# Altium PCB Main.PcbDoc (part 1 of 2)
Units mm, origin at the board's own origin, x right, y up, seen from the top; angles counter-clockwise.
Board outline 40.1 x 80 mm, 2 copper layers (Top Layer, Bottom Layer), stack 1.569 mm thick; 84 components, 82 nets, 339 pads, 242 vias.
Unrouted connection lines stored in the file: 3.
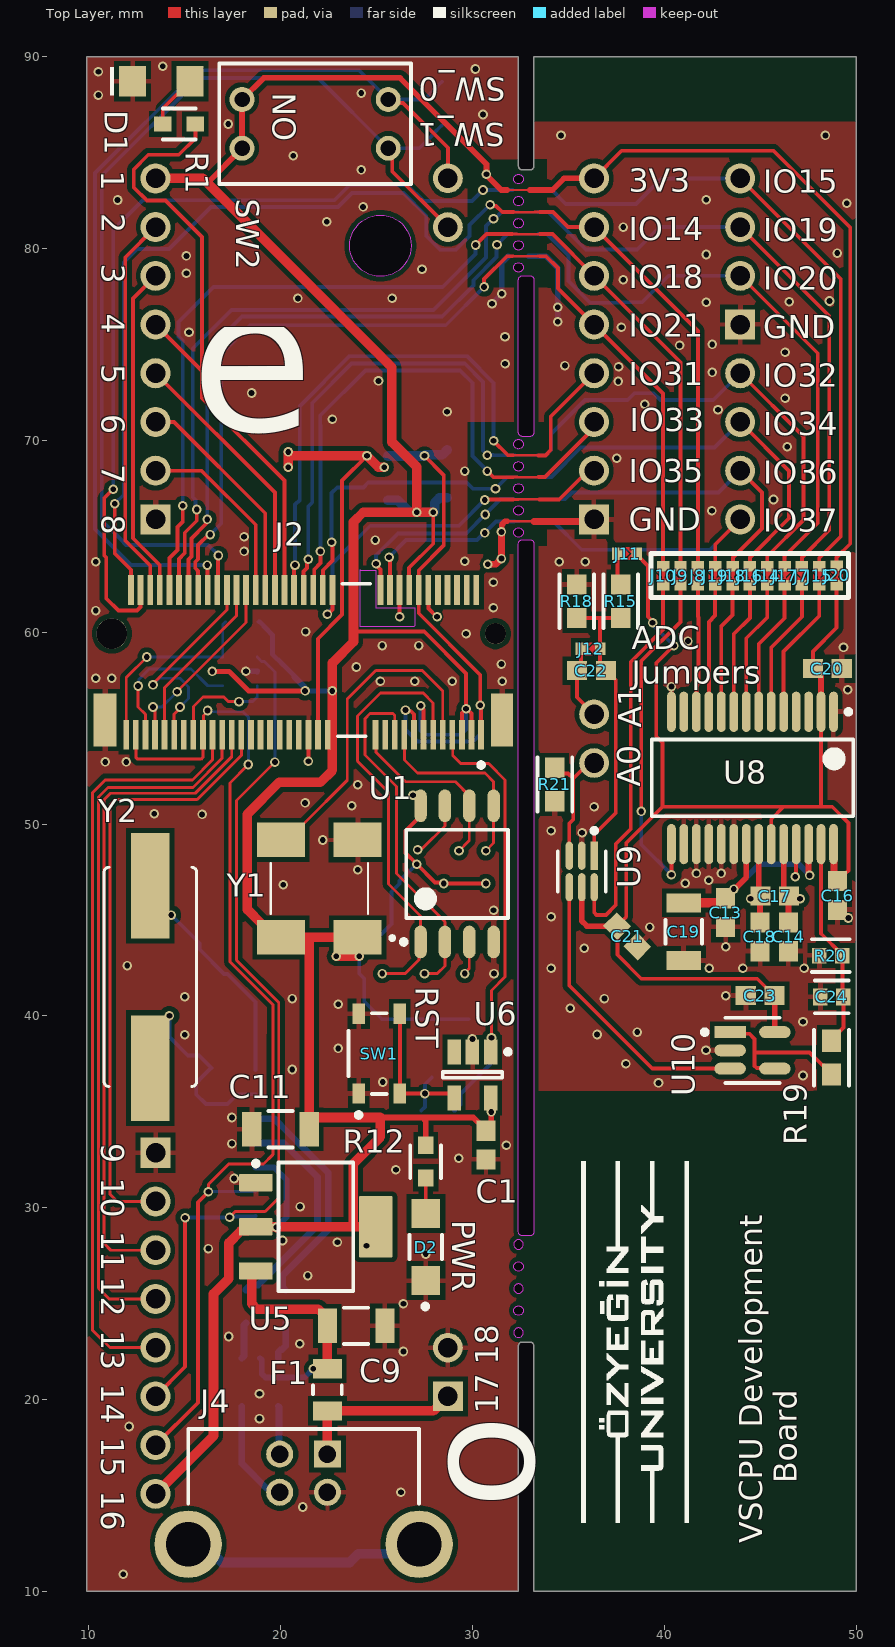
[diagram p0: Top Layer view]
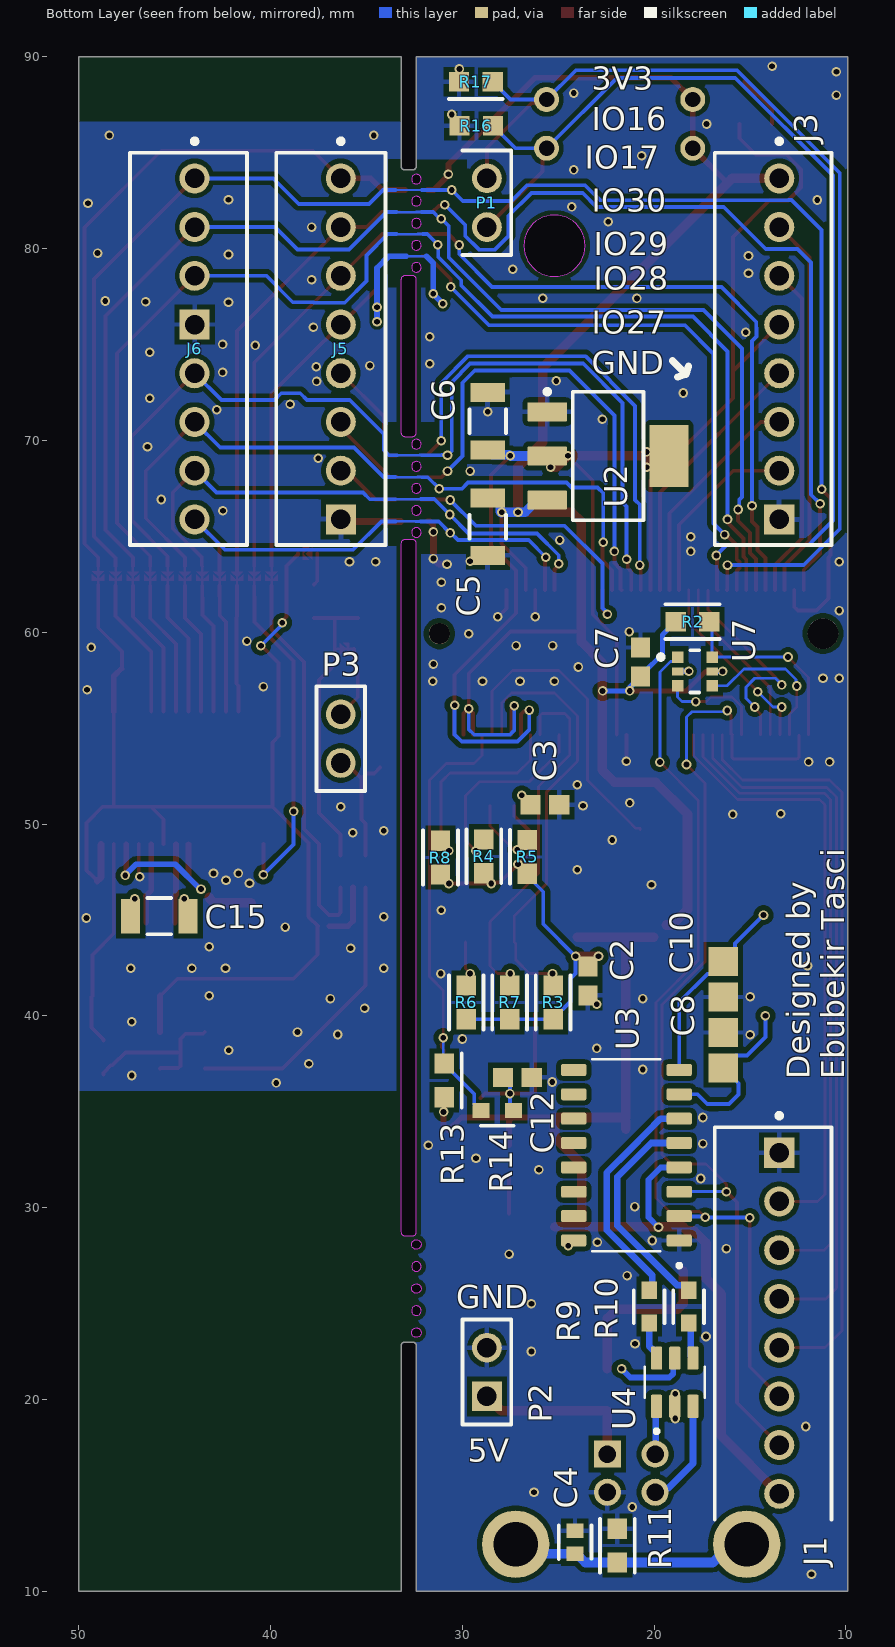
[diagram p1: Bottom Layer view, seen from below]
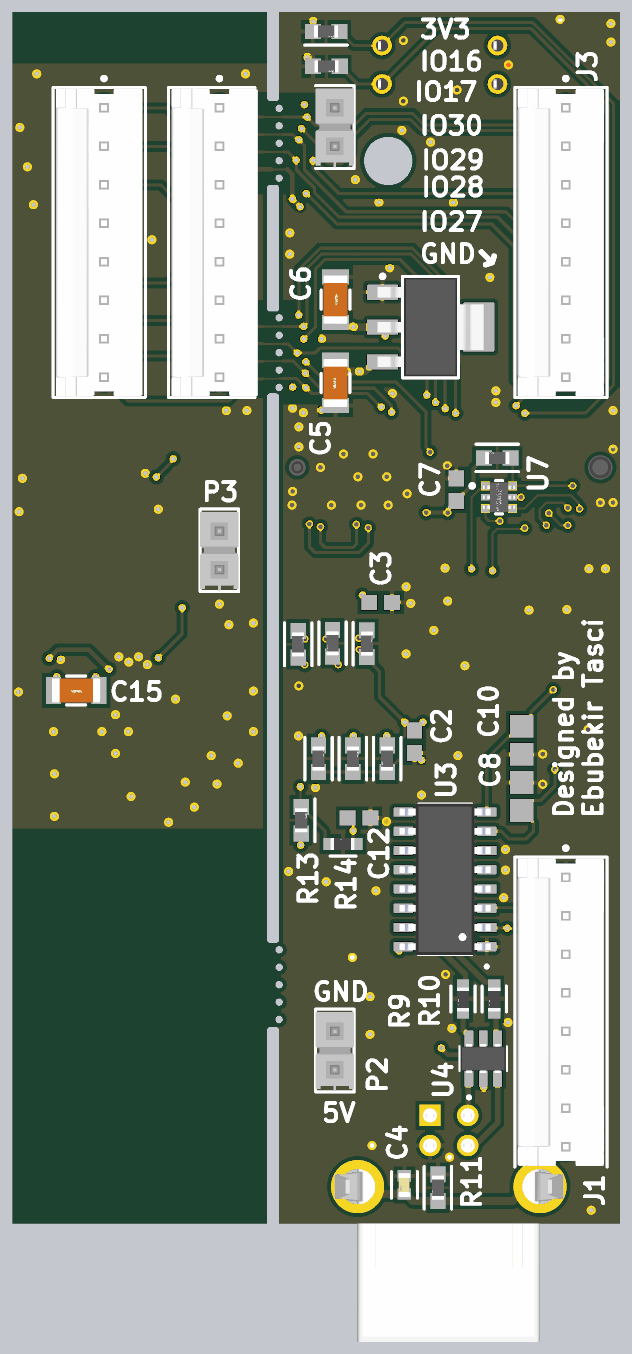
[diagram p3: 3D render of the assembled board from below, using the file's embedded part models]

## Layer stack, top to bottom
Top Solder: solder mask 0.0254, SM-001, Dk 4
Top Layer: signal copper 0.035
Dielectric 1: core 1.4986, Core-043, Dk 4.3
Bottom Layer: signal copper 0.035
Bottom Solder: solder mask 0.0254, SM-001, Dk 4

## Board outline
9.9,10 32.4,10 32.4,22.801 cw(c32.59,22.801) 32.592,22.991 32.804,22.989 32.988,22.991 cw(c32.991,22.781) 33.2,22.781 33.2,10 50,10 50,90 33.2,90 33.2,84.3 cw(c33,84.3) 33,84.1 32.6,84.1 cw(c32.6,84.3) 32.4,84.3 32.4,86 32.4,90 9.9,90
cut-out: 32.399,28.731 32.399,64.62 cw(c32.599,64.62) 32.599,64.82 33.002,64.82 cw(c33.002,64.62) 33.202,64.62 33.202,28.731 cw(c33.002,28.731) 33.002,28.531 32.599,28.531 cw(c32.599,28.731)
cut-out: 32.4,70.4 32.4,78.38 cw(c32.6,78.38) 32.6,78.58 33,78.58 cw(c33,78.38) 33.2,78.38 33.2,70.4 cw(c33,70.4) 33,70.2 32.6,70.2 cw(c32.6,70.4)
cut-out: 32.15,26.93 cw(c32.4,26.93) 32.4,27.18 cw(c32.4,26.93) 32.65,26.93 cw(c32.4,26.93) 32.4,26.68 cw(c32.4,26.93)
cut-out: 32.15,28.08 ccw(c32.4,28.08) 32.4,27.83 ccw(c32.4,28.08) 32.65,28.08 ccw(c32.4,28.08) 32.4,28.33 ccw(c32.4,28.08)
cut-out: 32.15,23.48 ccw(c32.4,23.48) 32.4,23.23 ccw(c32.4,23.48) 32.65,23.48 ccw(c32.4,23.48) 32.4,23.73 ccw(c32.4,23.48)
cut-out: 32.15,25.78 ccw(c32.4,25.78) 32.4,25.53 ccw(c32.4,25.78) 32.65,25.78 ccw(c32.4,25.78) 32.4,26.03 ccw(c32.4,25.78)
cut-out: 32.15,24.63 cw(c32.4,24.63) 32.4,24.88 cw(c32.4,24.63) 32.65,24.63 cw(c32.4,24.63) 32.4,24.38 cw(c32.4,24.63)
cut-out: 32.4,83.37 cw(c32.4,83.62) 32.15,83.62 cw(c32.4,83.62) 32.4,83.87 cw(c32.4,83.62) 32.65,83.62 cw(c32.4,83.62)
cut-out: 32.4,82.22 cw(c32.4,82.47) 32.15,82.47 cw(c32.4,82.47) 32.4,82.72 cw(c32.4,82.47) 32.65,82.47 cw(c32.4,82.47)
cut-out: 32.4,78.77 cw(c32.4,79.02) 32.15,79.02 cw(c32.4,79.02) 32.4,79.27 cw(c32.4,79.02) 32.65,79.02 cw(c32.4,79.02)
cut-out: 32.15,81.32 cw(c32.4,81.32) 32.4,81.57 cw(c32.4,81.32) 32.65,81.32 cw(c32.4,81.32) 32.4,81.07 cw(c32.4,81.32)
cut-out: 32.15,80.17 cw(c32.4,80.17) 32.4,80.42 cw(c32.4,80.17) 32.65,80.17 cw(c32.4,80.17) 32.4,79.92 cw(c32.4,80.17)
cut-out: 32.4,69.55 cw(c32.4,69.8) 32.15,69.8 cw(c32.4,69.8) 32.4,70.05 cw(c32.4,69.8) 32.65,69.8 cw(c32.4,69.8)
cut-out: 32.15,68.65 cw(c32.4,68.65) 32.4,68.9 cw(c32.4,68.65) 32.65,68.65 cw(c32.4,68.65) 32.4,68.4 cw(c32.4,68.65)
cut-out: 32.15,65.2 cw(c32.4,65.2) 32.4,65.45 cw(c32.4,65.2) 32.65,65.2 cw(c32.4,65.2) 32.4,64.95 cw(c32.4,65.2)
cut-out: 32.4,67.25 cw(c32.4,67.5) 32.15,67.5 cw(c32.4,67.5) 32.4,67.75 cw(c32.4,67.5) 32.65,67.5 cw(c32.4,67.5)
cut-out: 32.4,66.1 cw(c32.4,66.35) 32.15,66.35 cw(c32.4,66.35) 32.4,66.6 cw(c32.4,66.35) 32.65,66.35 cw(c32.4,66.35)
cut-out: 25.2,78.55 cw(c25.2,80.15) 23.6,80.15 cw(c25.2,80.15) 25.2,81.75 cw(c25.2,80.15) 26.8,80.15 cw(c25.2,80.15)

## Design rules (kind name [scope] priority, off if disabled: settings)
Clearance [All] p1: gap=0.254 ignorepadtopadclearanceinfootprint=TRUE except(0.15: Arc-Arc Arc-Track Track-Track; 0.2: Arc-SMDPad Arc-Via Arc-Hole Track-SMDPad Track-Via Track-Hole SMDPad-SMDPad)
DiffPairsRouting [All] p1: maxlimit=0.25 minlimit=0.2 mostfreqgap=0.2 toplayer_minwidth=0.25 toplayer_maxwidth=0.35 toplayer_prefwidth=0.25 bottomlayer_minwidth=0.25 bottomlayer_maxwidth=0.35 bottomlayer_prefwidth=0.25 maxuncoupledlength=5
MinimumSolderMaskSliver [All] p1: minsoldermaskwidth=0.1
NetAntennae [All] p1: netantennaetolerance=1.5
PlaneConnect [All] p1: pad.planeconnectstyle=Relief pad.reliefexpansion=0.508 pad.reliefentries=4 pad.reliefconductorwidth=0.254 pad.reliefairgap=0.254 via.planeconnectstyle=Direct via.reliefexpansion=0.508 via.reliefentries=4 via.reliefconductorwidth=0.254 via.reliefairgap=0.254
PolygonConnect [All] p1: thpad.connectstyle=Relief thpad.reliefconductorwidth=0.254 thpad.reliefentries=4 thpad.polygonreliefangle="90 Angle" thpad.airgapwidth=0.254 smdpad.connectstyle=Relief smdpad.reliefconductorwidth=0.254 smdpad.reliefentries=4 smdpad.polygonreliefangle="90 Angle" smdpad.airgapwidth=0.254 via.connectstyle=Direct via.reliefconductorwidth=0.254 via.reliefentries=4 via.polygonreliefangle="90 Angle" via.airgapwidth=0.254
RoutingVias [All] p1: holewidth=0.711 width=1.27 viastyle="Through Hole" minholewidth=0.711 minwidth=1.27 maxholewidth=0.711 maxwidth=1.27
SilkToSolderMaskClearance [IsPad] p1: minsilkscreentomaskgap=0.2 clearancetoexposedcopper=TRUE
SolderMaskExpansion [All] p1: expansion=0.05 istentingtop=FALSE
SupplyNets "Schematic Supply Nets_5" [InNet('+3.3V_ADC')] p1: voltage=0.000
SupplyNets "Schematic Supply Nets_4" [InNet('+5V')] p2: voltage=0.000
SupplyNets "Schematic Supply Nets_3" [InNet('+5V_USB')] p3: voltage=0.000
SupplyNets "Schematic Supply Nets_2" [InNet('GND')] p4: voltage=0.000
SupplyNets "Schematic Supply Nets_1" [InNet('+3.3V')] p5: voltage=0.000
SupplyNets "Schematic Supply Nets" [InNet('+1.8V')] p6: voltage=0.000
Width [All] p1: maxlimit=2 minlimit=0.127 preferedwidth=0.2 minimp=50.000000 maximp=50.000000 favimp=50.000000
25 further rules are at their usual default settings.

## Classes and differential pairs
differential pair USB_1: +USB_1_P -USB_1_N
differential pair USB_2: +USB_2_P -USB_2_N

## Components (designator, comment, footprint, x,y, rotation, side; value= is the part's Value field where it differs from the comment)
C1 "100nF 0603" CAPC1608X90X35NL15T15 30.706,33.261 r90 top
C2 "100nF 0603" CAPC1608X90X35NL15T15 23.458,41.817 r90 bottom
C3 "100nF 0603" CAPC1608X90X35NL15T15 25.7,51 r0 bottom
C4 "4.7nF 0603" FP-C0603C-CF-MFG 24.13,12.56 r90 bottom value="4,700 pF"
C5 "10uF 1206" FP-CC1206-FD-MFG 28.679,65.5 r90 bottom
C6 "10uF 1206" FP-CC1206-FD-MFG 28.679,71 r270 bottom
C7 "100nF 0603" CAPC1608X90X35NL15T15 20.712,58.449 r270 bottom
C8 "22pF 0805" CAPC2013X145X48ML20T23 16.4,38.204 r90 bottom
C9 "10uF 1206" FP-CC1206-FD-MFG 23.937,23.833 r180 top
C10 "22pF 0805" CAPC2013X145X48ML20T23 16.4,41.908 r270 bottom
C11 "10uF 1206" FP-CC1206-FD-MFG 19.989,34.089 r0 top
C12 "100nF 0603" CAPC1608X90X35NL15T15 27.13,36.79 r180 bottom
C13 "100nF 0603" CAPC1608X90X35NL15T15 43.2,45.377 r270 top
C14 "100nF 0603" CAPC1608X90X35NL15T15 46.478,44.113 r90 top
C15 "10uF 1206" FP-CC1206-FD-MFG 45.8,45.2 r0 bottom
C16 "100nF 0603" CAPC1608X90X35NL15T15 49.04,46.271 r90 top
C17 "100nF 0603" CAPC1608X90X35NL15T15 45.762,46.242 r0 top
C18 "100nF 0603" CAPC1608X90X35NL15T15 44.99,44.113 r90 top
C19 "10uF 1206" FP-CC1206-FD-MFG 41.021,44.387 r90 top
C20 "100nF 0603" CAPC1608X90X35NL15T15 48.5,58.1 r180 top
C21 "100nF 0603" CAPC1608X90X35NL15T15 38.066,44.145 r315 top
C22 "100nF 0603" CAPC1608X90X35NL15T15 36.204,58 r180 top
C23 "100nF 0603" CAPC1608X90X35NL15T15 45.002,41.054 r0 top
C24 "4.7nF 0603" FP-C0603C-CF-MFG 48.739,40.985 r180 top value="4,700 pF"
D1 "LED 1206 AMBER" WL-SMCW_1206_150120xx75000 13.783,88.725 r0 top
D2 "LED 1206 RED" FP-LTST-C150KRKT-MFG 27.566,27.945 r90 top
F1 "FSMD020-0805-R" FP-0805L-MFG 22.437,20.504 r90 top value=0.15-0.85Ω
J1 "640456-8" FP-640456-8-MFG#1 13.797,23.97 r90 bottom
J2 "2199230-4" FP-2199230-4-MFG 21.2,58.55 r180 top
J3 "640456-8" FP-640456-8-MFG#2 13.797,74.77 r90 bottom
J4 "897-43-004-90-000000" FP-897-43-004-90-000000-MFG 21.2,10.3 r0 top
J5 "640456-8" FP-640456-8-MFG#2 36.657,74.77 r90 bottom
J6 "640456-8" FP-640456-8-MFG#3 44.277,74.77 r90 bottom
J7 "JUMPER" JUMPER 47.177,62.989 r180 top net-tie
J8 "JUMPER" JUMPER 41.751,62.989 r180 top net-tie
J9 "JUMPER" JUMPER 40.847,62.989 r180 top net-tie
J10 "JUMPER" JUMPER 39.943,62.989 r180 top net-tie
J11 "JUMPER" "Copy of JUMPER" 38.013,64.099 r270 top net-tie
J12 "JUMPER" JUMPER 36.207,59.129 r90 top net-tie
J14 "JUMPER" JUMPER 45.368,62.989 r180 top net-tie
J15 "JUMPER" JUMPER 48.081,62.989 r180 top net-tie
J16 "JUMPER" JUMPER 44.464,62.989 r180 top net-tie
J17 "JUMPER" JUMPER 46.273,62.989 r180 top net-tie
J18 "JUMPER" JUMPER 43.56,62.989 r180 top net-tie
J19 "JUMPER" JUMPER 42.656,62.989 r180 top net-tie
J20 "JUMPER" JUMPER 48.985,63.008 r180 top net-tie
P1 "TSW-102-26-L-S" SMTC-TSW-102-26-XX-S#1 28.72,81.12 r90 bottom
P2 "TSW-102-26-L-S" SMTC-TSW-102-26-XX-S#2 28.72,20.16 r90 bottom
P3 "TSW-102-26-L-S" SMTC-TSW-102-26-XX-S#1 36.339,53.18 r90 bottom
R1 "100R 0603" FP-RT0603-MFG 14.703,86.496 r0 top value=100Ω
R2 "10k 0603" FP-AC0603-IPC_A 18.002,60.547 r0 bottom
R3 "10k 0603" FP-AC0603-IPC_A 25.268,40.7 r270 bottom
R4 "10k 0603" FP-AC0603-IPC_A 28.877,48.316 r270 bottom
R5 "10k 0603" FP-AC0603-IPC_A 26.61,48.29 r90 bottom
R6 "10k 0603" FP-AC0603-IPC_A 29.8,40.7 r90 bottom
R7 "10k 0603" FP-AC0603-IPC_A 27.534,40.7 r90 bottom
R8 "10k 0603" FP-AC0603-IPC_A 31.143,48.248 r90 bottom
R9 "100R 0603" FP-RT0603-MFG 20.261,24.837 r270 bottom value=100Ω
R10 "100R 0603" FP-RT0603-MFG 18.2,24.837 r270 bottom value=100Ω
R11 "1MR 0603" FP-AC0603-IPC_A 21.917,12.377 r270 bottom
R12 "100R 0603" FP-RT0603-MFG 27.566,32.399 r270 top value=100Ω
R13 "10k 0603" FP-AC0603-IPC_A 30.942,36.634 r90 bottom
R14 "100R 0603" FP-RT0603-MFG 28.182,35.065 r0 bottom value=100Ω
R15 "1MR 0603" FP-AC0603-IPC_A 37.731,61.614 r90 top
R16 "10k 0603" FP-AC0603-IPC_A 29.277,86.4 r180 bottom
R17 "10k 0603" FP-AC0603-IPC_A 29.3,88.7 r180 bottom
R18 "1MR 0603" FP-AC0603-IPC_A 35.439,61.614 r270 top
R19 "2.2k 0603" FP-RN73R1J-IPC_A 48.718,37.824 r90 top
R20 "3.3k 0603" FP-TFCR0603-IPC_C 48.686,43.142 r0 top
R21 "1MR 0603" FP-AC0603-IPC_A 34.295,52.062 r90 top
SW1 "PTS810 SJG 250 SMTR LFS" FP-PTS810_SJG_250_SMTR_LF-MFG 25.14,38.03 r90 top
SW2 "418117170902" 418117170902 21.8,86.5 r90 top
U1 "MX25L3233FM2I-08G" MXIC-SOP-8_N 29.2,47.4 r90 top
U2 "TLV1117LV18DCYR" DCY0004A_M 22.4,69.187 r180 bottom
U3 "CH340G" SOIC127P600X180-16N 21.446,32.732 r0 bottom
U4 "USBLC6-2SC6" SOT95P280X145-6N 18.928,20.898 r90 bottom
U5 "TLV1117LV33DCYR" DCY0004A_N 21.834,29 r0 top
U6 "MCP1319MT-33AE/OT" SOT-23-OT5_M 30,36.92 r270 top
U7 "74LVC1G157GW,125" FP-SOT363-MFG 17.883,57.955 r180 bottom
U8 "AD9280ARSZ" RS-28_N 44.6,52.4 r270 top
U9 "SN74LVC1G3157DCKR" FP-DCK0006A-IPC_B 35.7,47.525 r270 top
U10 "MCP6001T-I/OT" FP-C04-091-OT-IPC_A 44.6,38.2 r0 top
Y1 "ASV-10.000MHZ-E-T" XTAL_ASV-10.000MHZ-E-T 22.016,46.627 r180 top
Y2 "AS-12.000-20-SMD-TR" XTAL1170X500X450 13.207,42.029 r270 top

## Footprints (in the part's own frame and the unit in brackets; to place one, negate y for a bottom-side part, rotate by r counter-clockwise, add the part's x,y. Pads: shape width x height; smd on the part's side, far side on the other; paste and mask are expansions set on the pad)
418117170902 [mm] "2.54 mm compact THT with flat actuator, 2p"
  round 1.3 hole 0.8: 1(-1.27,-3.81) 2(1.27,-3.81) 3(1.27,3.81) 4(-1.27,3.81)
  silkscreen extent -3.14,-5 3.14,5, body extent -3.04,-4.95 3.04,4.95, height 5.75
CAPC1608X90X35NL15T15 [mm] "Chip Capacitor, 2-Leads, Body 1.60x0.81mm, IPC Medium Density"
  rect 1.05x1 smd: 1(-0.75,0) 2(0.75,0)
  body extent -0.88,-0.48 0.87,0.48, height 0.9
CAPC2013X145X48ML20T23 [mm] "Chip Capacitor, 2-Leads, Body 2.00x1.25mm, IPC Low Density"
  rect 1.5x1.55 smd: 1(-0.925,0) 2(0.925,0)
  body extent -1.1,-0.72 1.1,0.72, height 1.45
"Copy of JUMPER" [mm]
  rect 0.65x0.55 smd paste-2.54 mask-2.54: 1(0,-0.45) 2(0,0.55)
  Top Layer region: -0.325,-0.041 0,0.284 0.325,-0.041 0.325,0.318 -0.325,0.317
  Top Layer region: -0.325,-0.175 0.003,0.152 0.325,-0.175
DCY0004A_M [mm] "SOT223, 4-Leads, Body 6.7x3.7mm, Pitch 2.3mm, IPC Low Density"
  rrect10% 2.05x1 smd: 1(-3.175,2.3) 2(-3.175,0) 3(-3.175,-2.3)
  rrect5% 2.05x3.25 smd: 4(3.175,0)
  silkscreen extent -3.3,-3.35 1.85,3.47, body extent -3.5,-3.25 3.5,3.25, height 1.62
DCY0004A_N [mm] "SOT223, 4-Leads, Body 6.7x3.7mm, Pitch 2.3mm, IPC Medium Density"
  rrect11% 1.75x0.9 smd: 1(-3.125,2.3) 2(-3.125,0) 3(-3.125,-2.3)
  rrect6% 1.75x3.2 smd: 4(3.125,0)
  silkscreen extent -3.25,-3.35 1.95,3.42, body extent -3.5,-3.25 3.5,3.25, height 1.62
FP-0805L-MFG [mm]
  rect 1x1.5 smd paste+0 mask+0: 1(-1.1,0) 2(1.1,0)
  silkscreen extent -0.23,-0.75 0.23,0.75, body extent -1.05,-0.67 1.05,0.67, height 1.25
FP-897-43-004-90-000000-MFG [mm]
  rect 1.41x1.41 hole 0.91 paste-2539.97 mask+0: 1(1.24,6.85)
  round 1.41 hole 0.91 paste-2539.97 mask+0: 2(-1.25,6.85) 3(-1.25,4.86) 4(1.24,4.86)
  round 3.51 hole 2.31 paste-2539.97 mask+0: 5(-6.02,2.15) 6(6.02,2.15)
  silkscreen extent -6.02,4.28 6.02,8.15, body extent -7.88,-8.25 7.88,8.25, height 0.25
FP-640456-8-MFG#1 [mil]
  rect 61.65x61.65 hole 40 paste-99999 mask+0: 1(350,-12.5)
  round 61.65 hole 40 paste-99999 mask+0: 2(250,-12.5) 3(150,-12.5) 4(50,-12.5) 5(-50,-12.5) 6(-150,-12.5) 7(-250,-12.5) 8(-350,-12.5)
  silkscreen extent -403,-120 431,120, body extent -400,-113 400,113, height 415
FP-640456-8-MFG#2 [mil]
  round 61.65 hole 40 paste-99999 mask+0: 1(350,-12.5) 2(250,-12.5) 3(150,-12.5) 4(50,-12.5) 5(-50,-12.5) 6(-150,-12.5) 7(-250,-12.5)
  rect 61.65x61.65 hole 40 paste-99999 mask+0: 8(-350,-12.5)
  silkscreen extent -402,-120 431,120, body extent -400,-113 400,113, height 415
FP-640456-8-MFG#3 [mil]
  round 61.65 hole 40 paste-99999 mask+0: 1(350,-12.5) 2(250,-12.5) 3(150,-12.5) 5(-50,-12.5) 6(-150,-12.5) 7(-250,-12.5) 8(-350,-12.5)
  rect 61.65x61.65 hole 40 paste-99999 mask+0: 4(50,-12.5)
  silkscreen extent -402,-120 431,120, body extent -400,-113 400,113, height 415
FP-2199230-4-MFG [mm]
  rect 0.3x1.55 smd paste+0 mask+0: 1(-9.25,3.9) 2(-9,-3.65) 3(-8.75,3.9) 4(-8.5,-3.65) 5(-8.25,3.9) 6(-8,-3.65) 7(-7.75,3.9) 8(-7.5,-3.65) 9(-7.25,3.9) 10(-7,-3.65) 11(-6.75,3.9) 12(-6.5,-3.65) 13(-6.25,3.9) 14(-6,-3.65) 15(-5.75,3.9) 16(-5.5,-3.65) 17(-5.25,3.9) 18(-5,-3.65) 19(-4.75,3.9) 20(-4.5,-3.65) 21(-4.25,3.9) 22(-4,-3.65) 23(-3.75,3.9) 32(-1.5,-3.65) 33(-1.25,3.9) 34(-1,-3.65) 35(-0.75,3.9) 36(-0.5,-3.65) 37(-0.25,3.9) 38(0,-3.65) 39(0.25,3.9) 40(0.5,-3.65) 41(0.75,3.9) 42(1,-3.65) 43(1.25,3.9) 44(1.5,-3.65) 45(1.75,3.9) 46(2,-3.65) 47(2.25,3.9) 48(2.5,-3.65) 49(2.75,3.9) 50(3,-3.65) 51(3.25,3.9) 52(3.5,-3.65) 53(3.75,3.9) 54(4,-3.65) 55(4.25,3.9) 56(4.5,-3.65) 57(4.75,3.9) 58(5,-3.65) 59(5.25,3.9) 60(5.5,-3.65) 61(5.75,3.9) 62(6,-3.65) 63(6.25,3.9) 64(6.5,-3.65) 65(6.75,3.9) 66(7,-3.65) 67(7.25,3.9) 68(7.5,-3.65) 69(7.75,3.9) 70(8,-3.65) 71(8.25,3.9) 72(8.5,-3.65) 73(8.75,3.9) 74(9,-3.65) 75(9.25,3.9)
  rect 1.15x2.75 smd paste+0 mask+0: 76(-10.35,3.125)
  rect 1.2x2.75 smd paste+0 mask+0: 77(10.35,3.125)
  round 1.1 hole 1.1 unplated paste-2539.97 mask+0: ""(-10,-1.375)
  round 1.6 hole 1.6 unplated paste-2539.97 mask+0: ""(10,-1.375)
  silkscreen extent -9.38,-3.98 -1.78,5.6, body extent -11.1,-4.52 11.1,4.77, height 0.25
FP-AC0603-IPC_A [mm]
  rect 1.059x1.012 smd paste+0 mask+0: 1(-0.877,0) 2(0.877,0)
  silkscreen extent -1.41,-0.91 1.41,0.91, body extent -0.8,-0.4 0.8,0.4, height 0.55
FP-C04-091-OT-IPC_A [mil]
  rect 64.5x24.33 smd paste+0 mask+0: 1(-45.91,37.4)
  rrect100% 64.5x24.33 smd paste+0 mask+0: 2(-45.91,0) 3(-45.91,-37.4) 4(45.91,-37.4) 5(45.91,37.4)
  silkscreen extent -103,-67 55,67
FP-C0603C-CF-MFG [mm]
  rect 0.75x0.9 smd paste+0 mask+0: 1(-0.6,0) 2(0.6,0)
  silkscreen extent -0.87,-0.85 0.88,0.85, body extent -0.8,-0.4 0.8,0.4, height 0.87
FP-CC1206-FD-MFG [mm]
  rect 1x1.8 smd paste+0 mask+0: 1(-1.5,0) 2(1.5,0)
  silkscreen extent -0.63,-0.95 0.63,0.95, body extent -1.6,-0.8 1.6,0.8, height 1.9
FP-DCK0006A-IPC_B [mm]
  rect 1.464x0.376 smd paste+0 mask+0: 1(-0.82,0.65)
  rrect100% 1.464x0.376 smd paste+0 mask+0: 2(-0.82,0) 3(-0.82,-0.65) 4(0.82,-0.65) 5(0.82,0) 6(0.82,0.65)
  silkscreen extent -2.25,-1.25 1.05,1.25
FP-LTST-C150KRKT-MFG [mm]
  rect 1.5x1.5 smd paste+0 mask+0: 1(-1.75,0) 2(1.75,0)
  silkscreen extent -3.22,-0.85 0.63,0.85, body extent -2.6,-0.95 2.6,0.95, height 0.25
FP-PTS810_SJG_250_SMTR_LF-MFG [mm]
  rect 1.05x0.65 smd paste+0 mask+0: 1(-2.075,1.075) 2(2.075,1.075) 3(-2.075,-1.075) 4(2.075,-1.075)
  silkscreen extent -3.32,-0.38 2.1,1.6, body extent -2.7,-1.7 2.7,1.7, height 0.25
FP-RN73R1J-IPC_A [mm]
  rect 1.156x1.012 smd paste+0 mask+0: 1(-0.875,0) 2(0.875,0)
  silkscreen extent -1.45,-0.91 1.45,0.91, body extent -1.95,-1.01 1.95,1.01, height 0.25
FP-RT0603-MFG [mm]
  rect 0.9x0.8 smd paste+0 mask+0: 1(-0.85,0) 2(0.85,0)
  silkscreen extent -0.85,-0.81 0.86,0.8, body extent -1.4,-0.55 1.4,0.55, height 0.25
FP-SOT363-MFG [mm]
  rect 0.6x0.6 smd paste-1000 mask+0: 1(-0.9,0.75) 3(-0.9,-0.75) 4(0.9,-0.75) 6(0.9,0.75)
  rect 0.6x0.4 smd paste+0 mask+0: 2(-0.9,0) 5(0.9,0)
  silkscreen extent -1.9,-1.1 0.23,1.1, body extent -1.05,-1 1.05,1, height 1.1
FP-TFCR0603-IPC_C [mm]
  rect 0.758x0.812 smd paste+0 mask+0: 1(-0.602,0) 2(0.602,0)
  silkscreen extent -0.98,-0.85 0.98,0.85, body extent -1.08,-0.55 1.08,0.55, height 0.25
JUMPER [mm]
  rect 0.65x0.55 smd paste-2.54 mask-2.54: 1(0,-0.45) 2(0,0.55)
  Top Layer region: -0.325,-0.175 0.003,0.152 0.325,-0.175
  Top Layer region: -0.325,-0.041 0,0.284 0.325,-0.041 0.325,0.318 -0.325,0.317
  Top Layer lines w0.127: 0,0.55 0,-0.45
MXIC-SOP-8_N [mm] "SOP, 8-Leads, Body 5.4x5.3mm, Pitch 1.27mm, IPC Medium Density"
  oval 1.7x0.65 smd: 1(-3.55,1.905) 2(-3.55,0.635) 3(-3.55,-0.635) 4(-3.55,-1.905) 5(3.55,-1.905) 6(3.55,-0.635) 7(3.55,0.635) 8(3.55,1.905)
  silkscreen extent -3.67,-2.65 2.3,2.9, body extent -3.95,-2.65 3.95,2.65, height 2.16
RS-28_N [mm] "SOP, 28-Leads, Body 10.2x5.3mm, Pitch 0.65mm, IPC Medium Density"
  oval 2.1x0.45 smd: 1(-3.45,4.225) 2(-3.45,3.575) 3(-3.45,2.925) 4(-3.45,2.275) 5(-3.45,1.625) 6(-3.45,0.975) 7(-3.45,0.325) 8(-3.45,-0.325) 9(-3.45,-0.975) 10(-3.45,-1.625) 11(-3.45,-2.275) 12(-3.45,-2.925) 13(-3.45,-3.575) 14(-3.45,-4.225) 15(3.45,-4.225) 16(3.45,-3.575) 17(3.45,-2.925) 18(3.45,-2.275) 19(3.45,-1.625) 20(3.45,-0.975) 21(3.45,-0.325) 22(3.45,0.325) 23(3.45,0.975) 24(3.45,1.625) 25(3.45,2.275) 26(3.45,2.925) 27(3.45,3.575) 28(3.45,4.225)
  silkscreen extent -3.57,-5.25 2,5.25, body extent -2.8,-5.25 2.8,5.25, height 2
SMTC-TSW-102-26-XX-S#1 [mm] ".025 SQ Post Terminal Strip Assembly, 1x2 Pins, Vertical, 2.54mm Pitch, Male"
  round 1.55 hole 1.02: 1(0,0) 2(2.54,0)
  silkscreen extent -1.46,-1.27 4,1.27, body extent -1.4,-1.27 3.81,1.27, height 8.38
SMTC-TSW-102-26-XX-S#2 [mm] ".025 SQ Post Terminal Strip Assembly, 1x2 Pins, Vertical, 2.54mm Pitch, Male"
  rect 1.55x1.55 hole 1.02: 1(0,0)
  round 1.55 hole 1.02: 2(2.54,0)
  silkscreen extent -1.46,-1.27 4,1.27, body extent -1.4,-1.27 3.81,1.27, height 8.38
SOIC127P600X180-16N [mm]
  rrect25% 1.31x0.62 smd: 1(-2.75,4.445) 2(-2.75,3.175) 3(-2.75,1.905) 4(-2.75,0.635) 5(-2.75,-0.635) 6(-2.75,-1.905) 7(-2.75,-3.175) 8(-2.75,-4.445) 9(2.75,-4.445) 10(2.75,-3.175) 11(2.75,-1.905) 12(2.75,-0.635) 13(2.75,0.635) 14(2.75,1.905) 15(2.75,3.175) 16(2.75,4.445)
  silkscreen extent -2.85,-5 1.78,5.85, body extent -3,-5 3,5, height 1.8
SOT95P280X145-6N [mm]
  rrect25% 1.21x0.59 smd: 1(-1.255,0.95) 2(-1.255,0) 3(-1.255,-0.95) 4(1.255,-0.95) 5(1.255,0) 6(1.255,0.95)
  silkscreen extent -2.65,-1.57 0.81,1.57, body extent -1.4,-1.46 1.4,1.46, height 0.4
SOT-23-OT5_M [mm] "SOT23, 5-Leads, Body 2.9x1.7mm, Pitch 0.95mm, Lead Span 2.8mm, IPC Low Density"
  rect 1.3x0.7 smd: 1(-1.2,0.95) 2(-1.2,0) 3(-1.2,-0.95) 4(1.2,-0.95) 5(1.2,0.95)
  silkscreen extent -1.32,-1.55 0.15,1.98, body extent -0.9,-1.55 0.9,1.55, height 1.45
WL-SMCW_1206_150120xx75000 [mm] "SMD Mono-color Chip LED, body 3.2x1.6mm"
  rect 1.4x1.6 smd: 1(-1.5,0) 2(1.5,0)
  silkscreen extent -2.68,-0.75 -2.48,0.75, body extent -1.6,-0.8 1.6,0.8, height 0.68
XTAL1170X500X450 [mm]
  rect 5.5x2 smd: 1(-4.75,0) 2(4.75,0)
  silkscreen extent -5.72,-2.41 5.72,2.41, body extent -6.75,-2.5 6.75,2.5, height 4.5
XTAL_ASV-10.000MHZ-E-T [mm]
  rect 2.5x1.8 smd: 1(-2,2.54) 2(-2,-2.54) 3(2,-2.54) 4(2,2.54)
  silkscreen extent -3.89,-1.32 2.54,2.67

## Part data
C1 C2 C3 C7 C12 C13 C14 C16 C17 C18 C20 C21 C22 C23: library part CMP-2006-02299-1, Manufacturer=Kemet, Part Number=C0603C104K4RAC7013
C4 C24: library part CMP-03020-030904-1, "C0603 4,700 pF X7R 30ppm/°C 20.00% 50 V", Capacitance="4,700 pF", Manufacturer=KEMET, Manufacturer Part Number=C0603C472M5RACAUTO, Package=C0603C-CF, Temperature="-55°C to +125°C", Temperature Characteristic=X7R, Temperature Coefficient=30ppm/°C, Temperature Range High=+125°C, Temperature Range Low=-55°C, Tolerance=0.2, Voltage Rating="50 V", Automotive=Yes, Automotive Grade="Grade 1", Category=Cap, ComponentLink2Description=Datasheet, ComponentLink2URL=https://api.kemet.com/component-edge/download/datasheet/C0603C100J5GACAUTO.pdf, Device Class L1="Passive Components", Device Class L2=Capacitors, Device Class L3="Ceramic Capacitors", Height=0.87mm, Lead Free=Yes, Material=Ceramic, Octopart=https://octopart.com/c0603c472m5racauto-kemet-21768561, RoHS=TRUE
C5 C6 C9 C11 C15 C19: library part CMP-03422-001420-1, "CAP CER 10UF 50V X5R 1206 / CC1206KKX5R9BB106", Capacitance=10uF, Case/Package=1206, Dielectric=X5R, Max Operating Temperature=85°C, Min Operating Temperature=-55°C, Tolerance=10%, Voltage Rating=50V, Halogen Free="Halogen Free", Lead Free="Lead Free", Length=0.126inch, Mount="Surface Mount", Packaging="Tape and Reel", RoHS Compliant=Yes, Thickness=0.075inch, Voltage Rating (DC)=50V, Width=0.063inch
C8 C10: library part CMP-2007-01710-1, Manufacturer=Vitramon, Part Number=VJ0805A220KXAMC
D1: library part CMP-1426-00018-5, "Led, 1206, Amber, 140Mcd, 605Nm;", Case Code (Imperial)=1206, Case Code (Metric)=3216, Color=Orange, Forward Current=100mA, Forward Voltage=2V, Manufacturer Lifecycle Status=ACTIVE, Max Operating Temperature=85°C, Max Reverse Voltage (DC)=5V, Min Operating Temperature=-40°C, Test Current=20mA, Case/Package=1206, Dominant Wavelength=605nm, Height=680µm, Length=3.2mm, Lens Style="Clear, Rectangular", Lifecycle Status=Production, Luminous Intensity=140mcd, Mount="Surface Mount", Packaging="Tape and Reel", Peak Wavelength=610nm, REACH SVHC=Unknown, RoHS=Compliant, Viewing Angle=140°, Wavelength=605nm, Width=1.6mm, YEOL="1 = Estimated lifetime > 10 years"
D2: library part CMP-2000-06617-2, "LED RED CLEAR 1206 SMD / LTST-C150KRKT", Case Code (Imperial)=1206, Case Code (Metric)=3216, Color=Red, Forward Current=30mA, Forward Voltage=2V, Lens Color=Colorless, Max Operating Temperature=85°C, Min Operating Temperature=-30°C, Package Quantity=1, Power Dissipation=62.5mW, Power Rating=75mW, Reverse Voltage=5V, Test Current=20mA, Case/Package=1206, Depth=1.6mm, Dominant Wavelength=631nm, Height=1.1mm, Illumination Color=Red, Lead Free="Lead Free", Length=3.2mm, Lens Style=Diffused, Lens Transparency=Clear, Luminous Intensity=54mcd, Mount="Surface Mount", Number of Elements=1, Number of LEDs=1, Number of Pins=2, Packaging="Tape and Reel", Radiation Hardening=No, Viewing Angle=130°, Wavelength=639nm, Width=1.6mm
F1: library part CMP-08606-000023-1, "PTC RESET FUSE 9V 200MA 0805", Ambient Temperature Range High=+85°C, Ambient Temperature Range Low=-40°C, Hold Current=0.2A, Manufacturer="Littelfuse Inc.", Manufacturer Part Number=0805L050WR, Package=0805L, Resistance=0.15-0.85Ω, Temperature="-40°C to +85°C", Trip Current=1A, Voltage Rating=6V, Automotive=No, Category=Fuse, Device Class L1="Circuit Protection", Device Class L2="PTC Resettable Fuses", Device Class L3=unset, Digikey Description="PTC RESET FUSE 6V 500MA 0805", Height=1.25mm, Lead Free=Yes, Octopart=https://octopart.com/0805l050wr-littelfuse-673858, RoHS=TRUE, Temperature Range High=+85°C, Temperature Range Low=-40°C, Trip Time=0.1s
J1 J3 J5 J6: library part CMP-03369-000098-1, "CONN HEADER VERT 8POS 2.54MM", RoHS Compliant=Yes
J2: library part CMP-03365-000002-1, "CONN FEMALE 67POS 0.020 GOLD", Current Rating=0.5A, Manufacturer="TE Connectivity", Package=0, Temperature="-40°C to +80°C", Temperature Range High=+80°C, Temperature Range Low=-40°C, Voltage Rating=50V, Automotive=No, Category=Conn, ComponentLink2Description=Datasheet, ComponentLink2URL=https://www.te.com/commerce/DocumentDelivery/DDEController?Action=showdoc&DocId=Customer+Drawing%7F2199230%7FB3%7Fpdf%7FEnglish%7FENG_CD_2199230_B3.pdf%7F2199230-4, Conn Gender=Female, Conn Orientation="Right Angle", Contact Material=Gold,Nickel, Device Class L1=Connectors, Device Class L2="Card Edge Connectors", Device Class L3=unset, Digikey Description="CONN FEMALE 67POS 0.020 GOLD", Height=4.2mm, Is Female=yes, Lead Free=Yes, Manufacturer Part Number=2199230-4, Mouser Description="PCI Express / PCI Connectors .5PITCH 4.2H KEY E EMBOSS NGFF MINICARD", Number Of Contacts=67, Number of Rows=2, Octopart=https://octopart.com/2199230-4-te+connectivity-46436156, Pitch=0.5mm, RoHS=TRUE
J4: library part CMP-07782-000001-1, "CONN RCPT USB2.0 TYPEB 4POS R/A", Flammability Rating="UL94 V-0", Insulation Resistance=1GR, Max Current Rating=1A, Max Voltage Rating (AC)=30V, Package Quantity=150, Connector Type=USB, Contact Material="Copper Alloy", Contact Plating=Gold, Depth=16mm, Gender=Receptacle, Housing Material=Thermoplastic, Lead Free="Lead Free", Length=12.03mm, Mount="Through Hole", Number Of Contacts=4, Number of Ports=1, Number of Positions=4, Number of Terminals=4, Orientation="Right Angle", Packaging=Tray, REACH SVHC="No SVHC", Termination="Through Hole", USB Standard="USB 2.0"
J7 J8 J9 J10 J12 J14 J15 J16 J17 J18 J19 J20: library part CMP-009-00061-3, Pins=2
J11: library part CMP-009-00061-5, Pins=2
P1 P2 P3: library part CMP-1024-00330-1, "0.025\" SQ Post Header, Through-hole, Vertical, -55 to 125 degC, 2.54 mm Pitch, 2-Pin, Male, RoHS", Manufacturer=Samtec, Temperature Range="-55 to 125 degC", ComponentLink1Description="Manufacturer URL", ComponentLink1URL=http://www.samtec.com, ComponentLink2Description=Datasheet, ComponentLink2URL=http://www.samtec.com/documents/webfiles/pdf/TSW_TH.PDF, ComponentLink3Description="Package Specification", ComponentLink3URL=http://www.samtec.com/documents/webfiles/cpdf/TSW-XXX-XX-XXX-X-XX-XXX-MKT.pdf, DatasheetVersion=F-214, Mounting Technology=Through-hole, Orientation=Vertical, PackageDescription=".025[0.64] SQ. Post Terminal Strip Assembly", PackageReference=TSW-102-26-XX-S, PackageVersion="DM, 8/1988", PartNumber=TSW-102-26-L-S, Pitch="2.54 mm", RoHS=True
R1 R9 R10 R12 R14: library part CMP-03412-003691-1, "Res Thin Film 0603 100 Ohm 0.1% 1/10W ±10ppm/°C Molded SMD Paper T/R", Manufacturer=Yageo, Manufacturer Part Number=RT0603BRB07100RL, Package=RT0603, Power Rating=0.1W, Resistance=100Ω, Temperature="-55°C to +155°C", Temperature Coefficient="10 ppm/°C", Temperature Range High=+155°C, Temperature Range Low=-55°C, Tolerance=0.001, Voltage Rating=75V, Automotive=No, Category=Res, ComponentLink2Description=Datasheet, ComponentLink2URL=http://www.yageo.com/documents/recent/PYu-RT_1-to-0.01_RoHS_L_9.pdf, Composition="Thin Film", Device Class L1="Passive Components", Device Class L2=Resistors, Device Class L3="Chip SMD Resistors", Digikey Description="Res Thin Film 0603 100 Ohm 0.1% 1/10W ±10ppm/°C Molded SMD Paper T/R", Footprint Url=http://www.yageo.com/exep/pages/download/literatures/PYu-R_Mount_10.pdf, Height=0.55mm, Ipc Land Pattern Name=RESC16080X45, Lead Free=Yes, Mouser Description="Thin Film Resistors 1/10W 100 ohm .1% 10ppm", Octopart=https://octopart.com/rt0603brb07100rl-yageo-30314052, RoHS=TRUE, Series=RT
R2 R3 R4 R5 R6 R7 R8 R13 R16 R17: library part CMP-03412-040683-1, "RES 10kΩ 5.00% 0.2W 0603"
R11 R15 R18 R21: library part CMP-03412-042588-1, "RES 1MΩ 1.00% 0.1W 0603", Case/Package=0603, Resistance=1MR, Tolerance=1%, RoHS Compliant=Yes
R19: library part CMP-04015-005569-1, "2.2kΩ ±0.1% 0.1W, 1/10W Chip Resistor 0603 (1608 Metric) Moisture Resistant Thin Film"
R20: library part CMP-250906-234254-1, "RES Thin Film,  3.3kΩ, 0.1%, 0.1W, 100ppm/°C, 0603"
SW1: library part CMP-10040-000011-1, "SWITCH TACTILE SPST-NO 0.05A 16V", Contact Resistance=500mΩ, Current Rating=50mA, Manufacturer="C&K Components", Operating Force=400gf, Temperature="-40°C to +85°C", Temperature Range High=+85°C, Temperature Range Low=-40°C, Voltage Rating Dc=16V, Automotive=No, Category=Switch, ComponentLink2Description=Datasheet, ComponentLink2URL=https://www.ckswitches.com/media/1476/pts810.pdf, Device Class L1=Electromechanical, Device Class L2=Switches, Device Class L3="Tactile Switches", Digikey Description="SWITCH TACTILE SPST-NO 0.05A 16V", Electromechanical Life=100000Cycles, Height=2.7mm, Lead Free=Yes, Manufacturer Part Number="PTS810 SJG 250 SMTR LFS", Mouser Description="Switch Tactile N.O. SPST Button J-Bend 0.05A 16VDC 100000Cycles 3.92N SMD T/R", Octopart=https://octopart.com/pts810sjg250smtrlfs-c%26k+components-29380277, Package="PTS810 SJG 250 SMTR LFS", RoHS=TRUE, Throw Configuration=SPST-NO
SW2: library part CMP-1434-00002-4, "Dip Switch, 0.025A, 24Vdc, 2 Pos, Tht Rohs Compliant: Yes", Current Rating=25mA, Insulation Resistance=100MΩ, Manufacturer Lifecycle Status=ACTIVE, Max Operating Temperature=85°C, Min Operating Temperature=-40°C, Voltage Rating=24V, Body Material="PBT, Polybutylene", Contact Plating=Gold, Electrical Life=2kcycles, Length=6.08mm, Lifecycle Status=Production, Mechanical Life=2kcycles, Number of Positions=2, Pitch=2.54mm, RoHS=Compliant, Termination="PC Pin", Throw Configuration=SPST, Voltage Rating (DC)=24V, Washable=No, YEOL="1 = Estimated lifetime > 10 years"
U1: library part CMP-2000-05278-1, "CMOS MXSMIO(R) (Serial Multi I/O) Flash Memory, 32 Mbits (x1/x2/x4), 3 V, -40 to 85 degC, 8-Pin SOP", Manufacturer=Macronix, Package Description="8-Pin Small Outline Package, Body 5.23 x 5.28 mm, Pitch 1.27 mm", Package Reference=SOP-8, Datasheet URL=http://datasheet.octopart.com/MX25L3233FM2I-08G-Macronix-datasheet-38883555.pdf, Datasheet Version="Rev. 1.1, 01/2015", Manufacturer URL=http://www.macronix.com
U2: library part CMP-0395-00524-2, "Single Output LDO, 1 A, Fixed 1.8 V Output, 2 to 5.5 V Input, 4-pin SOT-223 (DCY), -40 to 125 degC, Green (RoHS & no Sb/Br)", Manufacturer="Texas Instruments", Accuracy(%)=2, Code_JEDEC=TO-261, ComponentLink1Description="Manufacturer URL", ComponentLink1URL=http://www.ti.com/, ComponentLink2Description=Datasheet, ComponentLink2URL=http://www.ti.com/general/docs/lit/getliterature.tsp?genericPartNumber=TLV1117LV18&fileType=pdf, ComponentLink3Description="Package Specification", ComponentLink3URL=http://www.ti.com/litv/pdf/mpds094a, DatasheetVersion=SBVS160A, Eco-Plan="Green (RoHS & no Sb/Br)", Fixed Output Options(V)=1.8, Iout(Max)(A)=1, Iq(Typ)(mA)=0.05, Mounting Technology="Surface Mount", PackageDescription="4-Pin Plastic Small Outline, Body 3.5 x 6.5 mm, Pitch 2.3 mm", PackageReference=DCY0004A, PackageVersion=4202506/B, PartNumber=TLV1117LV18DCYR, SubFamily="Single Channel LDO", Vdo(Typ)(mV)=1200, Vin(Max)(V)=5.5, Vin(Min)(V)=2, Vout Adj(Max)(V)=1.8, Vout Adj(Min)(V)=1.8
U3: library part CMP-064-000000-1, "USB Interface Integrated Circuit", Package=None, Availability="Not in stock", Check_prices=https://www.snapeda.com/parts/Ch340G/WCH/view-part/?ref=eda, Component Type=Standard, Design Item ID=CH340G, MF=WCH, MP=Ch340G, Pin Count=16, Price=None, SnapEDA_Link=https://www.snapeda.com/parts/Ch340G/WCH/view-part/?ref=snap, Source=CH340G.SchLib
U4: library part CMP-004-00031-1, "17V Clamp 5A (8/20Âµs) Ipp Tvs Diode Surface Mount SOT-23-6", Case/Package="SOT-23-6 STMicroelectronics", Availability="In Stock", Check_prices=https://www.snapeda.com/parts/USBLC6-2SC6/STMicroelectronics/view-part/?ref=eda, Component Type=Standard, Design Item ID=USBLC6-2SC6, MF=STMicroelectronics, MP=USBLC6-2SC6, Pins=6, Price=None, Purchase-URL=https://pricing.snapeda.com/search/part/USBLC6-2SC6/?ref=eda, SnapEDA_Link=https://www.snapeda.com/parts/USBLC6-2SC6/STMicroelectronics/view-part/?ref=snap, Source=USBLC6-2SC6.SchLib
U5: library part CMP-0395-00503-2, "Single Output LDO, 1 A, Fixed 3.3 V Output, 2 to 5.5 V Input, 4-pin SOT-223 (DCY), -40 to 125 degC, Green (RoHS & no Sb/Br)", Manufacturer="Texas Instruments", Accuracy(%)=2, Code_JEDEC=TO-261, ComponentLink1Description="Manufacturer URL", ComponentLink1URL=http://www.ti.com/, ComponentLink2Description=Datasheet, ComponentLink2URL=http://www.ti.com/general/docs/lit/getliterature.tsp?genericPartNumber=TLV1117LV33&fileType=pdf, ComponentLink3Description="Package Specification", ComponentLink3URL=http://www.ti.com/litv/pdf/mpds094a, DatasheetVersion=SBVS160A, Eco-Plan="Green (RoHS & no Sb/Br)", Fixed Output Options(V)=3.3, Iout(Max)(A)=1, Iq(Typ)(mA)=0.05, Mounting Technology="Surface Mount", PackageDescription="4-Pin Plastic Small Outline, Body 3.5 x 6.5 mm, Pitch 2.3 mm", PackageReference=DCY0004A, PackageVersion=4202506/B, PartNumber=TLV1117LV33DCYR, SubFamily="Single Channel LDO", Vdo(Typ)(mV)=1200, Vin(Max)(V)=5.5, Vin(Min)(V)=2, Vout Adj(Max)(V)=3.3, Vout Adj(Min)(V)=3.3
U6: library part CMP-0138-00181-1, "Voltage Supervisor, 5-Pin SOT-23, Extended Temperature, Tape and Reel", Code_IPC=SOT23-5, DatasheetVersion="revB, Oct-2007", PackageDescription="5-Lead Plastic Small Outline Transistor (OT) [SOT-23]", PackageReference=SOT-23-OT5, PackageVersion="revBB, Aug-2009"
U7: library part CMP-14348-000001-1, "IC SINGLE 2-INPUT MUX 6TSSOP", Ambient Temperature Range High=+125°C, Ambient Temperature Range Low=-40°C, Manufacturer=Nexperia, Max Supply Voltage=5.5V, Min Supply Voltage=1.65V, Nominal Supply Current=0.1uA, Package=SOT363, Temperature="-40°C to +125°C", Automotive=No, Category=IC, ComponentLink2Description=Datasheet, ComponentLink2URL=https://assets.nexperia.com/documents/data-sheet/74LVC1G157.pdf, Device Class L1="Integrated Circuits (ICs)", Device Class L2="Logic ICs", Device Class L3=Multiplexers, Digikey Description="IC SINGLE 2-INPUT MUX 6TSSOP", Footprint Url=https://assets.nexperia.com/documents/outline-drawing/SOT363.pdf, Height=1.1mm, Lead Free=Yes, Logic Function Desc=Non-inverting, Manufacturer Part Number=74LVC1G157GW,125, Mouser Description="74LVC Series 3.3 V Surface Mount Single 2-Input Multiplexer - SC-88", Number Of Circuits=1, Number Of Inputs=2, Number Of Outputs=1, Octopart=https://octopart.com/74lvc1g157gw%2C125-nexperia-78736121, Propagation Delay=2.2ns, RoHS=TRUE, Temperature Range High=+125°C, Temperature Range Low=-40°C
U8: library part CMP-0313-01607-2, "Single 8-Bit Analog-to-Digital Converter with Parallel Interface, 95 mW, 32MSPS, -40 to +85 degC, RS-28, Pb-Free, Tube", Generic Part Number=AD9280, Manufacturer="Analog Devices", Channels=1, Code_JEDEC=MO-150-AH, ComponentLink1Description="Manufacturer URL", ComponentLink1URL=http://www.analog.com/en/index.html, ComponentLink2Description=Datasheet, ComponentLink2URL=http://www.analog.com/static/imported-files/data_sheets/AD9280.pdf, ComponentLink3Description="Package Specification", ComponentLink3URL=http://www.analog.com/static/imported-files/packages/32122249223724RS_28.pdf, ComponentLink4Description="Product URL", ComponentLink4URL=http://www.analog.com/en/analog-to-digital-converters/ad-converters/ad9280/products/product.html, DatasheetVersion=Rev.E, Interface=Par, Mounting Technology="Surface Mount", PackageDescription="28-Lead Shrink Small Outline Package [SSOP]", PackageReference=RS-28, PackageVersion=060106-A, Packing=Tube, PartNumber=AD9280ARSZ, Resolution (Bits)=8, RoHS=Y, Throughput Rate (SPS)=32M
U9: library part CMP-0859-00516-4, "IC SWITCH SPDT SC70-6", Case/Package=SC, High Level Output Current=128mA, Max Operating Temperature=125°C, Max Supply Current=10uA, Max Supply Voltage=5.5V, Min Operating Temperature=-40°C, Min Supply Voltage=1.65V, On-State Resistance=15R, Operating Supply Current=1uA, Package Quantity=3000, Bandwidth=300MHz, Contact Plating=Gold, Height=0.9mm, Lead Free="Lead Free", Length=2mm, Low Level Output Current=128mA, Mount="Surface Mount", Nominal Supply Current=10uA, Number of Bits=1, Number of Channels=1, Number Of Inputs=1, Number Of Outputs=2, Number of Pins=6, Packaging="Tape and Reel", Polarity=Non-Inverting, Propagation Delay=300ps, Radiation Hardening=No, REACH SVHC="No SVHC", RoHS Compliant=Yes, Supply Type=Single, Termination=SMD/SMT, Throw Configuration=SPDT, Turn-Off Delay Time=3.8ns, Turn-On Delay Time=5.7ns, Weight=8.8E-05oz, Width=1.25mm
U10: library part CMP-0187-00462-3, "IC OPAMP GP 1 CIRCUIT SOT23-5", Case/Package=SOT-23, Input Bias Current=1pA, Input Offset Voltage (Vos)=4.5mV, Max Operating Temperature=85°C, Max Supply Voltage=6V, Min Operating Temperature=-40°C, Min Supply Voltage=1.8V, Nominal Supply Current=100uA, Operating Supply Voltage=5.5V, Output Current=23mA, Package Quantity=1, Power Supply Rejection Ratio (PSRR)=86dB, Voltage Gain=112dB, Bandwidth=1MHz, Common Mode Rejection Ratio=60dB, Contact Plating=Tin, Gain Bandwidth Product=1MHz, Height=1.3mm, Lead Free="Lead Free", Length=3.1mm, Mount="Surface Mount", Number of Amplifiers=1, Number of Channels=1, Number Of Circuits=1, Number of Elements=1, Number of Pins=5, Operating Supply Current=100uA, Output Current per Channel=23mA, Packaging="Tape and Reel", Radiation Hardening=No, REACH SVHC="No SVHC", Slew Rate=0.6V/µs, Unity Gain Bandwidth Product=1MHz, Voltage=6V, Width=1.8mm
Y1: library part CMP-033-000000-1, Package=None, Availability=Unavailable, Component Type=Standard, Design Item ID=ASV-10.000MHZ-E-T, MP=ASV-10.000MHZ-E-T, Pin Count=4, Price=None, Source=ASV-10.000MHZ-E-T.SchLib
Y2: library part CMP-003-00030-1, "CRYSTAL, 12MHz, 20PF, SMD; Frequency:12MHz; Frequency Tolerance:Â± 30ppm; Load Capacitance:20pF; Operating Temperature Range:-20Â°C to +70Â°C; Crystal Mounting Type:SMD; Crystal Case Type:HC-49S; No. of Pins:2; MSL:MSL 1 - Unlimited", Case/Package="HC49SD Fox Electronics", Check_prices=https://www.snapeda.com/parts/FOXSDLF/120-20/Fox+Electronics/view-part/?ref=eda, Component Type=Standard, Design Item ID=FOXSDLF/120-20, MF="Fox Electronics", MP=FOXSDLF/120-20, Pins=2, SnapEDA_Link=https://www.snapeda.com/parts/FOXSDLF/120-20/Fox+Electronics/view-part/?ref=snap, Source=FOXSDLF_120-20.SchLib

## Via types
v1: diameter 0.5, hole 0.3, Top Layer to Bottom Layer, 242 vias

## Nets (pads, with @x,y where several pads share a name; then routed paths per layer and width w, separated by ;. In a path a pad name is that pad's centre, name@x,y a point inside that pad or via, vN(x,y) a via of type N, cw(c..) or ccw(c..) an arc to the next point about the centre after c; other vN are vias at no path point)
+1.8V: C6.2 J2.1 J2.14 J2.15 J2.35 U2.2 U2.4 | length 50.2
  Top Layer w0.2: J2.35@21.95,54.65 21.95,59.661 23.204,60.915 23.204,67.904 v1(24.5,69.2) ; v1(26.51,55.939) 26.567,55.881 26.794,55.881 26.95,55.725 J2.15@26.95,54.65 ; v1(27.5,69.2) 28.5,68.2 28.5,64.513 27.2,63.213 J2.14@27.2,62.2 27.2,60.985 30.403,57.782 v1(30.403,56.187) ; v1@30.401,56.189 30.45,56.14 J2.1@30.45,54.65
  Top Layer w0.5: v1(20.4,68.6) v1(20.4,69.4) ; v1@20.4,69.2 v1(24.5,69.2) 25.1,68.6 v1(25.4,68.6)
  Bottom Layer w0.2: v1(26.51,55.939) 26.51,54.922 27.132,54.3 30.033,54.3 30.403,54.67 v1(30.403,56.187)
  Bottom Layer w0.5: U2.2@25.575,69.187 27.487,69.187 27.55,69.25 28.429,69.25 C6.2@28.679,69.5
+3.3V: C1.2 C2.2 C3.2 C5.2 C7.2 C11.2 J1.8 J2.3 J2.5 J2.13 J2.16 J2.33 J3.1 J5.1 J20.1 R2.2 R3.2 R4.2 R5.1 R6.1 R7.1 R8.1 R12.1 R13.1 SW2.3 SW2.4 U1.8 U2.3 U3.4 U3.16 U5.2 U5.4 U6.5 U7.5 Y1.1 Y1.4 | length 236.6
  Top Layer w0.127: 31.8,83.052 32.996,83.052
  Top Layer w0.2: 22.631,52.8 22.631,52.865 ; 23.8,60.031 27.488,60.031 29.67,57.849 v1(29.67,56.009) ; J2.16@26.7,62.2 26.7,63.359 27.954,64.613 27.954,66.25 v1(27.95,66.254) ; U1.8@27.295,50.95 27.295,50.425 26.51,49.64 26.51,48.49 v1(27.1,47.9) 28.049,46.951 28.449,46.951 v1(28.5,46.9) v1(30.7,46.9) ; v1(27.3,56.159) 27.3,56.119 27.45,55.969 J2.13@27.45,54.65 ; J2.5@29.45,54.65 29.45,55.789 v1(29.67,56.009) ; v1@29.67,55.977 v1(29.67,56.009) ; v1@29.73,56.024 29.73,55.977 29.95,55.757 J2.3@29.95,54.65 ; J5.1@36.34,83.66 37.78,85.1 45.7,85.1 49.7,81.1 49.7,64.614 48.985,63.899 J20.1@48.985,63.458
  Top Layer w0.254: v1(16.434,57.956) 17.307,57.956 18.323,56.94 v1(21.272,56.94)
  Top Layer w0.3: 16.184,83.424 SW2.4@17.99,85.23 SW2.3@17.99,87.77 19.12,88.9 26.227,88.9 30.727,84.4 v1(30.727,83.87) ; 25.196,34.7 27.39,34.7 ; R12.1@27.566,33.249 27.566,34.524 27.39,34.7 ; v1@30.727,83.822 31.496,83.052 31.8,83.052 ; U6.5@30.95,35.72 30.964,35.706 30.964,35.005 v1(30.978,34.991) 30.978,34.283 C1.2@30.706,34.011 30.706,34.036 30.042,34.7 27.39,34.7 ; 32.996,83.052 34.168,83.052 34.776,83.66 J5.1@36.34,83.66
  Top Layer w0.5: J1.8@13.48,15.08 16.5,18.1 16.5,25.5 17.3,26.3 17.3,28.166 17.919,28.785 18.274,28.785 18.489,29 U5.2@18.709,29 19.721,29 v1@19.763,28.957 ; J3.1@13.48,83.66 15.948,83.66 16.184,83.424 25.8,73.808 25.8,69.91 27.1,68.61 v1(27.1,66.254) ; Y1.4@19.366,44.737 19.016,44.737 19.016,44.784 18.262,45.538 18.262,50.512 19.925,52.175 22.075,52.175 22.698,52.798 22.698,58.398 23.8,59.5 23.8,60.031 23.8,65.746 24.308,66.254 v1(27.1,66.254) ; v1(19.777,28.971) 19.806,29 23.781,29 ; Y1.4@20.016,44.087 21.489,44.087 ; C11.2@21.489,34.089 C11.2@21.489,34.489 ; v1(22.904,43.1) v1(24.1,43.1) ; Y1.1@24.016,44.087 21.489,44.087 ; U5.4@25.179,29 U5.4@24.959,29 23.781,29 ; v1(27.95,66.254) v1(27.1,66.254) ; 21.489,44.087 21.489,34.7 25.196,34.7 25.196,33.686 23.781,32.271 23.781,29
  Bottom Layer w0.2: v1(27.1,47.9) 27.074,47.9 26.204,47.03 26.204,46.887 25.783,46.466 25.783,44.783 v1(24.1,43.1) 24.1,42.2 24.36,41.94 24.36,40.754 25.268,39.847 R3.2@25.268,39.823 R7.1@27.534,39.823 R6.1@29.8,39.823 ; v1(27.3,56.159) 27.3,54.866 27.516,54.65 29.385,54.65 29.67,54.935 v1(29.67,56.009)
  Bottom Layer w0.254: v1(16.434,57.956) U7.5@16.983,57.955 ; R2.2@18.878,60.547 18.902,60.547 19.281,60.168 19.281,60.144 19.57,59.855 19.57,58.854 20.076,58.347 20.089,58.347 20.712,57.724 C7.2@20.712,57.699 ; v1(21.272,56.94) v1(22.69,56.94)
  Bottom Layer w0.3: U3.4@18.696,32.097 19.655,32.097 20.303,31.449 20.303,29.497 v1(19.777,28.971) ; C7.2@20.712,57.674 21.234,57.152 21.234,56.978 v1(21.272,56.94)
  Bottom Layer w0.5: U2.3@25.575,66.887 26.1,66.887 26.733,66.254 v1(27.1,66.254) v1(27.95,66.254) ; v1@27.975,66.229 28.029,66.283 28.029,66.75 28.279,67 C5.2@28.679,67
  other v1: 24.48,28.006 26.9,51.5